# Altium PCB DC-LAB-UPS-230V.PcbDoc (part 1 of 2)
Units mm, origin at the board's own origin, x right, y up, seen from the top; angles counter-clockwise.
Board outline 144.53 x 143.51 mm, 2 copper layers (Top Layer, Bottom Layer), stack 1.6 mm thick; 79 components, 50 nets, 289 pads, 57 vias.
Unrouted connection lines stored in the file: 4.
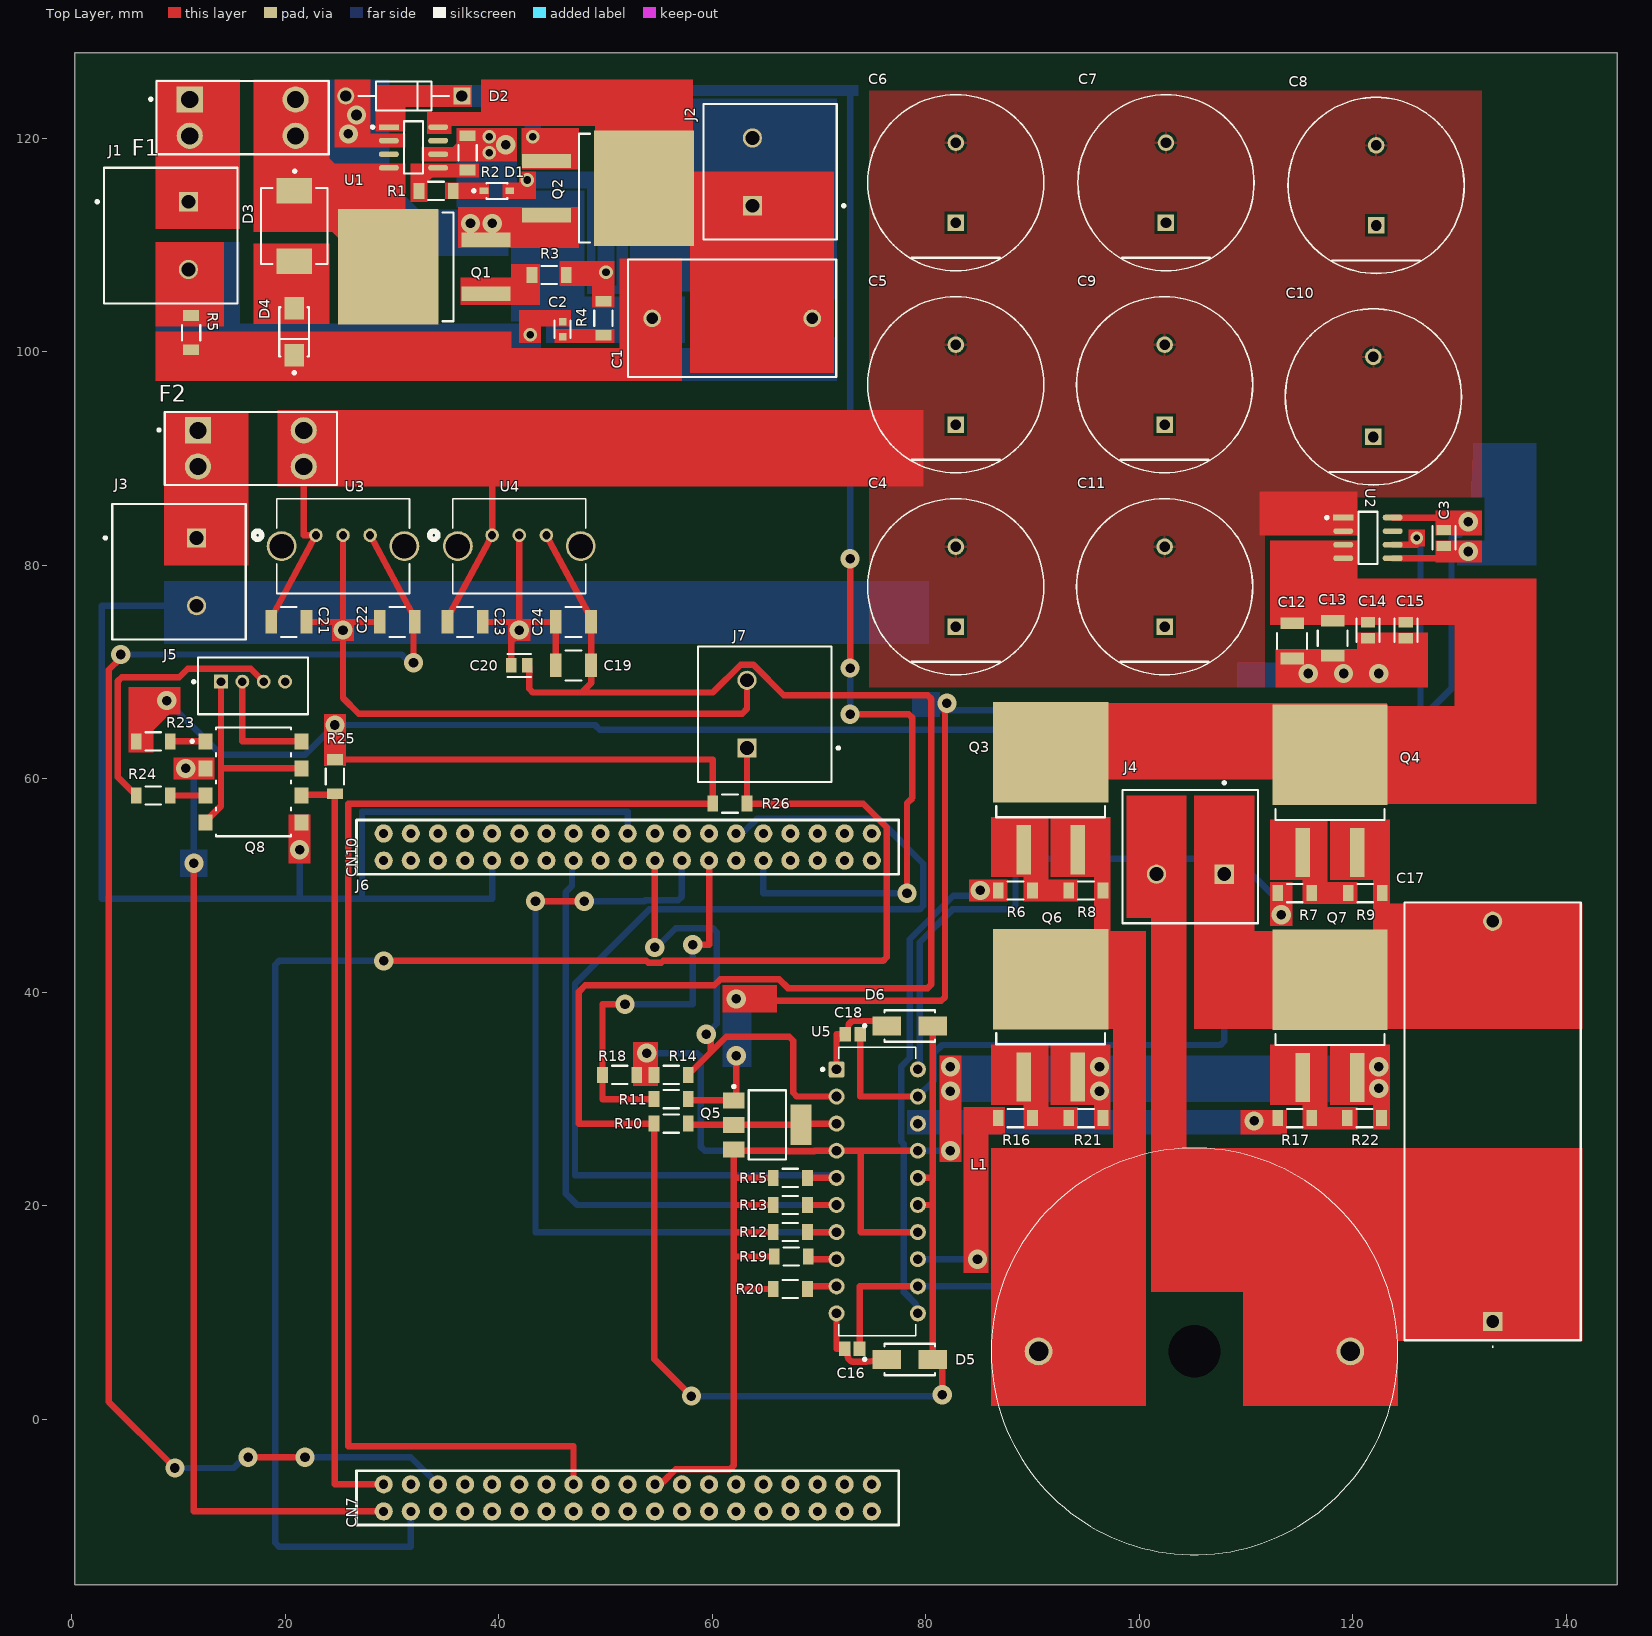
[diagram p0: Top Layer view]
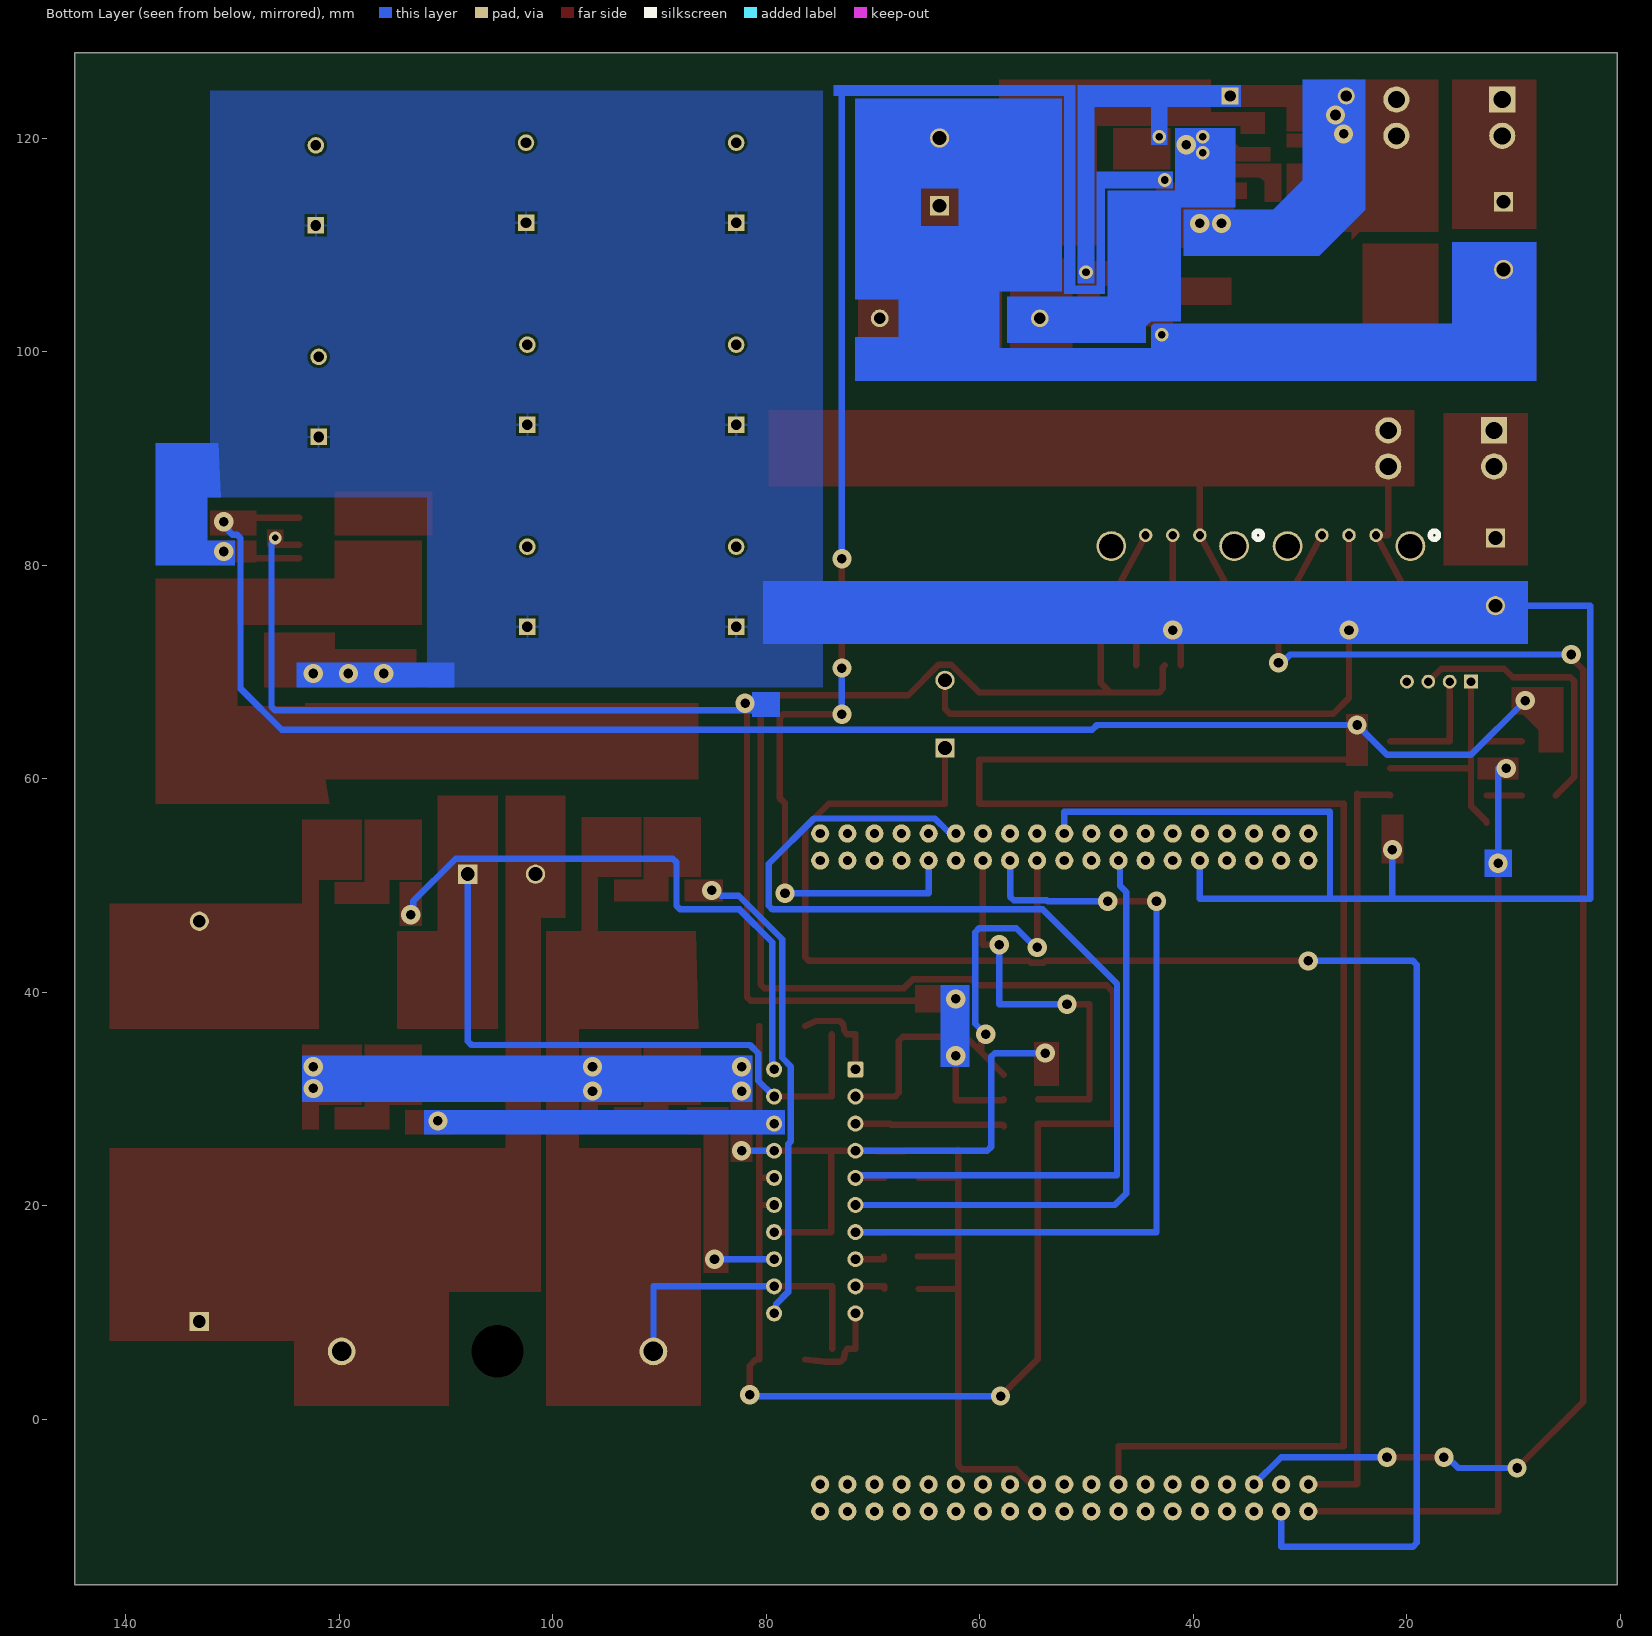
[diagram p1: Bottom Layer view, seen from below]

## Layer stack, top to bottom
Top Solder: solder mask 0.0102, Solder Resist, Dk 3.5
Top Layer: signal copper 0.07
Dielectric 1: dielectric 1.4605, FR-4, Dk 4.6
Bottom Layer: signal copper 0.07
Bottom Solder: solder mask 0.0102, Solder Resist, Dk 3.5

## Board outline
0.254,-15.494 144.78,-15.494 144.78,128.016 0.254,128.016

## Design rules (kind name [scope] priority, off if disabled: settings)
AssemblyTestPointUsage [All] p1: isadvanced=TRUE
AssemblyTestpoint [All] p1: isadvanced=TRUE testpointundercomponent=TRUE minsize=1.016 maxsize=2.54 preferedsize=1.524 minholesize=0 maxholesize=1.016 preferedholesize=0.813 testpointgrid=0.025 usegrid=TRUE gridtolerance=0 allowsidetop=TRUE allowsidebottom=TRUE
Clearance Clearance_1 [OnMid vs OnMid] p1: gap=0.254 ignorepadtopadclearanceinfootprint=FALSE sourcerule=42 cellrowname=All cellrowtype=0 cellcolname=All cellcoltype=0 innerlayers=TRUE
Clearance Clearance_2 [(ExistsOnLayer('Top Layer') Or ExistsOnLayer('Bottom Layer')) vs (ExistsOnLayer('Top Layer') Or ExistsOnLayer('Bottom Layer'))] p2: gap=0.254 ignorepadtopadclearanceinfootprint=FALSE sourcerule=42 cellrowname=All cellrowtype=0 cellcolname=All cellcoltype=0 outerlayers=TRUE
Clearance [All] p3: gap=0.254 ignorepadtopadclearanceinfootprint=FALSE ismatrix=TRUE
ComponentClearance [All] p1: isadvanced=TRUE gap=0.254 collisioncheckmode=3 verticalgap=0.254 showdistances=FALSE
FabricationTestPointUsage [All] p1: isadvanced=TRUE valid=0 allowmultiple=FALSE
FabricationTestpoint [All] p1: isadvanced=TRUE side=3 testpointundercomponent=TRUE minsize=1.016 maxsize=2.54 preferedsize=1.524 minholesize=0 maxholesize=1.016 preferedholesize=0.813 testpointgrid=0.025 allowsidetop=TRUE allowsidebottom=TRUE usegrid=TRUE gridtolerance=0
FanoutControl Fanout_BGA [IsBGA] p1: isadvanced=TRUE bgadir=Out bgaviamode=Centered fanoutstyle=Auto fanoutdirection=Alternating viagrid=0.025 // Fanout_BGA (Default Rule)
FanoutControl Fanout_LCC [IsLCC] p2: isadvanced=TRUE bgadir=Out bgaviamode=Centered fanoutstyle=Auto fanoutdirection=Alternating viagrid=0.025 // Fanout_LCC (Default Rule)
FanoutControl Fanout_SOIC [IsSOIC] p3: isadvanced=TRUE bgadir=Out bgaviamode=Centered fanoutstyle=Auto fanoutdirection=Alternating viagrid=0.025 // Fanout_SOIC (Default Rule)
FanoutControl Fanout_Small [(CompPinCount < 5)] p4: isadvanced=TRUE bgadir=Out bgaviamode=Centered fanoutstyle=Auto fanoutdirection=OutThenIn viagrid=0.025 // Fanout_Small (Default Rule)
FanoutControl Fanout_Default [All] p5: isadvanced=TRUE bgadir=Out bgaviamode=Centered fanoutstyle=Auto fanoutdirection=Alternating viagrid=0.025 // Fanout_Default (Default Rule)
Height [All] p1: isadvanced=TRUE minheight=0 maxheight=40.4 prefheight=12.7
HoleSize [All] p1: isadvanced=TRUE absolutevalues=TRUE maxlimit=2.54 minlimit=0.025 maxpercent=80.000 minpercent=20.000
HoleToHoleClearance [All] p1: isadvanced=TRUE gap=0.254 allowstackedmicrovias=TRUE
LayerPairs [All] p1: isadvanced=TRUE enforce=TRUE
MinimumSolderMaskSliver [All] p1: isadvanced=TRUE minsoldermaskwidth=0.254
NetAntennae [All] p1: isadvanced=TRUE netantennaetolerance=0
PasteMaskExpansion [All] p1: isadvanced=TRUE expansion=0
PlaneClearance [All] p1: isadvanced=TRUE clearance=0.508
PlaneConnect [All] p1: isadvanced=TRUE planeconnectstyle=Relief reliefexpansion=0.508 reliefentries=4 reliefconductorwidth=0.254 reliefairgap=0.254
PolygonConnect [All] p1: connectstyle=Relief reliefconductorwidth=0.254 reliefentries=4 polygonreliefangle="90 Angle" airgapwidth=0.254
RoutingCorners [All] p1: isadvanced=TRUE cornerstyle=45-Degree minsetback=2.54 maxsetback=2.54
RoutingPriority [All] p1: isadvanced=TRUE routingpriority=0
RoutingVias RoutingViaStyle_1 [All] p1: isadvanced=TRUE holewidth=0.254 width=0.254 viastyle="Through Hole" minholewidth=0.254 minwidth=0.254 maxholewidth=1.2 maxwidth=1.8
RoutingVias [All] p2: holewidth=0.711 width=1.27 viastyle="Through Hole" minholewidth=0.711 minwidth=1.27 maxholewidth=0.711 maxwidth=1.27
ShortCircuit [All] p1: isadvanced=TRUE allowed=FALSE
SilkToSilkClearance [All] p1: isadvanced=TRUE silktosilkclearance=0.254
SilkToSolderMaskClearance [IsPad] p1: isadvanced=TRUE minsilkscreentomaskgap=0.254 clearancetoexposedcopper=TRUE
SolderMaskExpansion [All] p1: isadvanced=TRUE expansion=0 istentingtop=FALSE
SupplyNets "Schematic Supply Nets_2" [InNet('BAT_OUT-')] p1: isadvanced=TRUE voltage=0.000
SupplyNets "Schematic Supply Nets_5" [InNet('BAT_OUT+')] p2: isadvanced=TRUE voltage=0.000
SupplyNets "Schematic Supply Nets_4" [InNet('BAT_IN+')] p3: isadvanced=TRUE voltage=0.000
SupplyNets "Schematic Supply Nets_1" [InNet('VIN-')] p4: isadvanced=TRUE voltage=0.000
SupplyNets "Schematic Supply Nets" [InNet('VIN+')] p5: isadvanced=TRUE voltage=0.000
UnRoutedNet [All] p1: isadvanced=TRUE
UnpouredPolygon [All] p1: isadvanced=TRUE
Width [All] p1: maxlimit=8 minlimit=0.254 preferedwidth=0.6 minimp=50.000000 maximp=50.000000 favimp=50.000000
4 further rules are at their usual default settings.

## Classes and differential pairs
component class Control_Stage: J5 J6 J7 Q8 R23 R24 R25 R26
component class Output_Stage: C3 C4 C5 C6 C7 C8 C9 C10 C11 C12 C13 C14 C15 C16 C17 C18 C19 C20 C21 C22 C23 C24 D5 D6 F2 J3 J4 L1 Q3 Q4 Q5 Q6 Q7 R6 R7 R8 R9 R10 R11 R12 R13 R14 R15 R16 R17 R18 R19 R20 R21 R22 U2 U3 U4 U5
component class Input_Stage: C1 C2 D1 D2 D3 D4 F1 J1 J2 Q1 Q2 R1 R2 R3 R4 R5 U1

## Components (designator, comment, footprint, x,y, rotation, side; value= is the part's Value field where it differs from the comment)
C1 "2.2uF 5%" WCAP-FTBP_L18W10H16.5 61.856,103.124 r180 top
C2 "10nF 10%" FP-C1608-080-0_1-MFG 45.974,102.108 r90 top
C3 "100nF 10%" FP-C0805C-DN-MFG 128.524,82.55 r270 top value="0.10 μF"
C4 "680uF 20%" FP-RAD-TH-D_16_0_5-L_25_2-MFG 82.804,77.978 r90 top
C5 "680uF 20%" FP-RAD-TH-D_16_0_5-L_25_2-MFG 82.804,96.901 r90 top
C6 "680uF 20%" FP-RAD-TH-D_16_0_5-L_25_2-MFG 82.804,115.824 r90 top
C7 "680uF 20%" FP-RAD-TH-D_16_0_5-L_25_2-MFG 102.489,115.824 r90 top
C8 "680uF 20%" FP-RAD-TH-D_16_0_5-L_25_2-MFG 122.174,115.57 r90 top
C9 "680uF 20%" FP-RAD-TH-D_16_0_5-L_25_2-MFG 102.362,96.901 r90 top
C10 "680uF 20%" FP-RAD-TH-D_16_0_5-L_25_2-MFG 121.92,95.758 r90 top
C11 "680uF 20%" FP-RAD-TH-D_16_0_5-L_25_2-MFG 102.362,77.978 r90 top
C12 "4.7uF 10%" FP-CNA6P-MFG 114.3,72.898 r270 top value=4.7uF
C13 "4.7uF 10%" FP-CNA6P-MFG 118.11,73.152 r270 top value=4.7uF
C14 "100nF 10%" FP-C0805C-DN-MFG 121.412,73.902 r90 top value="0.10 μF"
C15 "100nF 10%" FP-C0805C-DN-MFG 124.968,73.902 r90 top value="0.10 μF"
C16 "1uF 25V" CAPC2013X140X50LL20T25 73.09,6.604 r0 top
C17 "PHE426HR8100JR06L2" PHE426HR8100JR06L2 133.096,9.144 r90 top
C18 "1uF 25V" CAPC2013X140X50LL20T25 73.152,36.068 r0 top
C19 "4.7uF 10%" FP-CNA6P-MFG 46.99,70.612 r180 top value=4.7uF
C20 "100nF 10%" FP-C0805C-DN-MFG 41.91,70.612 r0 top value="0.10 μF"
C21 "4.7uF 10%" FP-CNA6P-MFG 20.32,74.676 r180 top value=4.7uF
C22 "10uF 10%" FP-C3225-250-0_4-MFG 30.48,74.676 r0 top
C23 "4.7uF 10%" FP-CNA6P-MFG 36.83,74.676 r180 top value=4.7uF
C24 "10uF 10%" FP-C3225-250-0_4-MFG 46.99,74.676 r0 top
D1 "BAV21WS-E3-08" FP-S8-V-3910_02-001-MFG 39.808,115.062 r0 top
D2 "Zener 12V" FP-017AH-MFG 31.092,123.952 r180 top
D3 "TVS 33V" FP-SMCJ-MFG 20.828,111.76 r270 top
D4 "TVS 24V" FP-SMAJ-MFG 20.828,101.854 r90 top
D5 "ES1D" FP-403AE-MFG 78.486,5.588 r0 top value=7pF
D6 "ES1D" FP-403AE-MFG 78.486,36.83 r0 top value=7pF
F1 "Fuse Holder 30A" FP-3568-MFG 16.002,121.92 r0 top
F2 "Fuse Holder 30A" FP-3568-MFG 16.764,90.932 r0 top
J1 "10-24 AWG" PHOE-1714955_V 10.922,110.871 r270 top
J2 "10-24 AWG" PHOE-1714955_V 63.754,116.84 r90 top
J3 "10-24 AWG" PHOE-1714955_V 11.684,79.375 r270 top
J4 "10-24 AWG" PHOE-1714955_V 104.775,51.054 r180 top
J5 "110990030" FP-110990030-MFG 16.97,68.688 r0 top
J6 "NUCLEO_L476RGT6_Headers" NUCLEO_L4764RGT6_Header 52.07,23.114 r90 top
J7 "10-24 AWG" PHOE-1714955_V 63.246,66.04 r90 top
L1 "1140-101K-RC" 1140101KRC 90.551,6.35 r0 top
Q1 "N-MOSFET 80V" FP-PG-TO263-3-MFG 33.02,107.95 r90 top
Q2 "N-MOSFET 80V" FP-PG-TO263-3-MFG 50.225,115.316 r270 top
Q3 "AHO" FP-PG-TO263-3-MFG 91.694,59.115 r0 top
Q4 "BHO" FP-PG-TO263-3-MFG 117.856,58.855 r0 top
Q5 "PZT3904T1G" ONSC-SOT-223-4-318E-04_V 65.154,27.562 r0 top
Q6 "ALO" FP-PG-TO263-3-MFG 91.694,37.846 r0 top
Q7 "BLO" FP-PG-TO263-3-MFG 117.856,37.779 r0 top
Q8 "LTV-827S-TA1" FP-LTV-827S-TA1-MFG 17.018,59.69 r0 top
R1 "1.02kR 1% 0.25W" FP-RT1206-MFG 34.112,115.062 r180 top value=1.02KΩ
R2 "47kR 1% 0.25W" FP-RT1206-MFG 37.084,118.618 r90 top value=47KΩ
R3 "10R 1% 0.25W" FP-RT1206-MFG 44.704,107.188 r180 top value=10Ω
R4 "10kR 1% 0.25W" FP-RT1206-MFG 49.784,103.124 r270 top value=10KΩ
R5 "1.02kR 1% 0.25W" FP-RT1206-MFG 11.176,101.778 r90 top value=1.02KΩ
R6 "10R 1% 0.25W" FP-RT1206-MFG 88.392,49.53 r180 top value=10Ω
R7 "10R 1% 0.25W" FP-RT1206-MFG 114.554,49.276 r180 top value=10Ω
R8 "10kR 1%" FP-RT1206-MFG 94.996,49.53 r0 top value=10KΩ
R9 "10kR 1%" FP-RT1206-MFG 121.158,49.276 r0 top value=10KΩ
R10 "10kR 1% 0.25W" FP-RT1206-MFG 56.134,27.686 r0 top value=10KΩ
R11 "4.7kR 1% 0.25W" FP-RT1206-MFG 56.134,29.972 r0 top value=4.7KΩ
R12 "4.7kR 1% 0.25W" FP-RT1206-MFG 67.31,17.526 r0 top value=4.7KΩ
R13 "4.7kR 1% 0.25W" FP-RT1206-MFG 67.31,20.066 r0 top value=4.7KΩ
R14 "4.7kR 1% 0.25W" FP-RT1206-MFG 56.134,32.258 r0 top value=4.7KΩ
R15 "4.7kR 1% 0.25W" FP-RT1206-MFG 67.31,22.606 r0 top value=4.7KΩ
R16 "10R 1% 0.25W" FP-RT1206-MFG 88.392,28.194 r180 top value=10Ω
R17 "10R 1% 0.25W" FP-RT1206-MFG 114.554,28.194 r180 top value=10Ω
R18 "100k 0.1%" FP-RT1206-MFG 51.308,32.258 r0 top value=100KΩ
R19 "100k 0.1%" FP-RT1206-MFG 67.386,15.24 r180 top value=100KΩ
R20 "100k 0.1%" FP-RT1206-MFG 67.31,12.192 r180 top value=100KΩ
R21 "10kR 1%" FP-RT1206-MFG 94.996,28.194 r0 top value=10KΩ
R22 "10kR 1%" FP-RT1206-MFG 121.082,28.194 r0 top value=10KΩ
R23 "680R 1% 0.25W" FP-RT1206-MFG 7.62,63.5 r0 top value=680Ω
R24 "680R 1% 0.25W" FP-RT1206-MFG 7.62,58.42 r0 top value=680Ω
R25 "3.3kR 1% 0.25W" FP-RT1206-MFG 24.638,60.198 r270 top value=3.3KΩ
R26 "10kR 1% 0.25W" FP-RT1206-MFG 61.646,57.658 r0 top value=10KΩ
U1 "IDEAL DIODE CONTROLLER" FP-S8-8-05-08-1610-IPC_C 32.004,119.126 r0 top
U2 "ACS711ELCTR-12AB-T" FP-LC-8-IPC_C 121.412,82.55 r0 top
U3 "TSR 1-4850WI" TSR1WI-SINGLE_TRP 22.86,82.804 r0 top
U4 "TSR 1-48120WI" TSR1WI-SINGLE_TRP 39.37,82.804 r0 top
U5 "HIP4081AIPZ" DIP762W46P254L2590H533Q20_E20_3_N 75.438,21.336 r0 top

## Footprints (in the part's own frame and the unit in brackets; to place one, negate y for a bottom-side part, rotate by r counter-clockwise, add the part's x,y. Pads: shape width x height; smd on the part's side, far side on the other; paste and mask are expansions set on the pad)
1140101KRC [mm]
  round 2.6 hole 1.826: 1(0,0) 2(29.21,0)
  round 2.451 hole 4.902 unplated: 3(14.605,0)
  silkscreen extent -4.44,-19.05 33.66,19.05, body extent -4.45,-19.05 33.65,19.05, height 26.35
CAPC2013X140X50LL20T25 [mm] "Chip Capacitor, 2-Leads, Body 2.00x1.25mm, IPC High Density"
  rect 1.1x1.35 smd: 1(-0.7,0) 2(0.7,0)
  body extent -1.1,-0.72 1.1,0.72, height 1.4
DIP762W46P254L2590H533Q20_E20_3_N [mm] "DIP, Lead Span 7.62mm, Lead Width 0.46mm, Pitch 2.54mm, Body Length 25.90mm, Height 5.33mm, IPC Medium Density"
  rrect25% 1.5x1.5 hole 0.9: 1(-3.81,11.43)
  round 1.5 hole 0.9: 2(-3.81,8.89) 3(-3.81,6.35) 4(-3.81,3.81) 5(-3.81,1.27) 6(-3.81,-1.27) 7(-3.81,-3.81) 8(-3.81,-6.35) 9(-3.81,-8.89) 10(-3.81,-11.43) 11(3.81,-11.43) 12(3.81,-8.89) 13(3.81,-6.35) 14(3.81,-3.81) 15(3.81,-1.27) 16(3.81,1.27) 17(3.81,3.81) 18(3.81,6.35) 19(3.81,8.89) 20(3.81,11.43)
  silkscreen extent -5.23,-13.51 3.62,13.51, body extent -3.95,-12.95 3.95,12.95, height 5.33
FP-017AH-MFG [mm]
  rect 1.6x1.6 hole 1.05 paste-2539.97 mask+0: 1(-5.438,0)
  round 1.6 hole 1.05 paste-2539.97 mask+0: 2(5.438,0)
  silkscreen extent -4.24,-1.36 4.24,1.36, body extent -6.34,-1.46 6.34,1.46, height 0.25
FP-403AE-MFG [mm]
  rect 2.65x1.75 smd paste+0 mask+0: 1(-2.15,0) 2(2.15,0)
  silkscreen extent -4.35,-1.48 2.37,1.48, body extent -3.57,-1.58 3.57,1.58, height 0.25
FP-3568-MFG [mm]
  round 2.45 hole 1.6 paste-2539.97 mask+0: 1(-4.96,-1.7) 2(4.96,-1.7) 2(4.96,1.7)
  rect 2.45x2.45 hole 1.6 paste-2539.97 mask+0: 1(-4.96,1.7)
  silkscreen extent -8.72,-3.43 8.07,3.43, body extent -8.17,-3.53 8.17,3.53, height 0.25
FP-110990030-MFG [mm]
  rect 1.3x1.3 hole 0.8 paste-2539.97 mask+0: 1(-3,0.4)
  round 1.3 hole 0.8 paste-2539.97 mask+0: 2(-1,0.4) 3(1,0.4) 4(3,0.4)
  silkscreen extent -5.67,-2.65 5.15,2.65, body extent -5.25,-2.75 5.25,2.75, height 0.25
FP-C0805C-DN-MFG [mm]
  rect 0.95x1.35 smd paste+0 mask+0: 1(-0.75,0) 2(0.75,0)
  silkscreen extent -1.1,-1.07 1.1,1.07, body extent -1.4,-0.85 1.4,0.85, height 0.25
FP-C1608-080-0_1-MFG [mm]
  rect 0.7x0.7 smd paste+0 mask+0: 1(-0.7,0) 2(0.7,0)
  silkscreen extent -0.8,-0.75 0.8,0.75, body extent -1.15,-0.55 1.15,0.55, height 0.25
FP-C3225-250-0_4-MFG [mm]
  rect 1.1x2.2 smd paste+0 mask+0: 1(-1.65,0) 2(1.65,0)
  silkscreen extent -0.72,-1.4 0.72,1.4, body extent -2.3,-1.5 2.3,1.5, height 0.25
FP-CNA6P-MFG [mm]
  rect 1.1x2.2 smd paste+0 mask+0: 1(-1.65,0) 2(1.65,0)
  silkscreen extent -0.72,-1.4 0.72,1.4, body extent -2.3,-1.5 2.3,1.5, height 0.25
FP-LC-8-IPC_C [mm]
  rect 1.874x0.542 smd paste+0 mask+0: 1(-2.316,1.905)
  rrect100% 1.874x0.542 smd paste+0 mask+0: 2(-2.316,0.635) 3(-2.316,-0.635) 4(-2.316,-1.905) 5(2.316,-1.905) 6(2.316,-0.635) 7(2.316,0.635) 8(2.316,1.905)
  silkscreen extent -3.97,-2.45 0.88,2.45, body extent -3.35,-2.55 3.35,2.55, height 0.25
FP-LTV-827S-TA1-MFG [mm]
  rect 1.3x1.5 smd paste+0 mask+0: 1(-4.5,3.81) 2(-4.5,1.27) 3(-4.5,-1.27) 4(-4.5,-3.81) 5(4.5,-3.81) 6(4.5,-1.27) 7(4.5,1.27) 8(4.5,3.81)
  silkscreen extent -5.87,-5.09 3.5,5.09, body extent -5.25,-5.19 5.25,5.19, height 0.25
FP-PG-TO263-3-MFG [mm]
  rect 1.35x4.6 smd paste-1000 mask+0: 1(-2.54,-5.775) 3(2.54,-5.775)
  rect 10.8x9.4 smd paste-1000 mask+0: 4(0,3.375)
  silkscreen extent -5.1,-2.73 5.1,-1.7, body extent -5.5,-8.18 5.5,8.18, height 0.25
FP-RAD-TH-D_16_0_5-L_25_2-MFG [mm]
  rect 1.55x1.55 hole 1 paste-2539.97 mask+0: 1(-3.75,0)
  round 1.55 hole 1 paste-2539.97 mask+0: 2(3.75,0)
  silkscreen extent -8.25,-8.25 8.25,8.25, body extent -8.35,-8.35 8.35,8.35, height 0.25
FP-RT1206-MFG [mm]
  rect 1x1.5 smd paste+0 mask+0: 1(-1.6,0) 2(1.6,0)
  silkscreen extent -0.72,-0.85 0.72,0.85, body extent -2.2,-0.95 2.2,0.95, height 0.25
FP-S8-8-05-08-1610-IPC_C [mm]
  rect 1.877x0.521 smd paste+0 mask+0: 1(-2.313,1.905)
  rrect100% 1.877x0.521 smd paste+0 mask+0: 2(-2.313,0.635) 3(-2.313,-0.635) 4(-2.313,-1.905) 5(2.313,-1.905) 6(2.313,-0.635) 7(2.313,0.635) 8(2.313,1.905)
  silkscreen extent -3.95,-2.45 0.87,2.45, body extent -3.35,-2.55 3.35,2.55, height 0.25
FP-S8-V-3910_02-001-MFG [mm]
  rect 0.8x0.6 smd paste+0 mask+0: 1(-1.2,0) 2(1.2,0)
  silkscreen extent -2.27,-0.75 0.97,0.75, body extent -1.7,-0.85 1.7,0.85, height 0.25
FP-SMAJ-MFG [mm]
  rect 2.1x1.8 smd paste+0 mask+0: 1(-2.2,0) 2(2.2,0)
  silkscreen extent -3.95,-1.4 2.3,1.4, body extent -3.35,-1.5 3.35,1.5, height 0.25
FP-SMCJ-MFG [mm]
  rect 2.4x3.3 smd paste+0 mask+0: 1(-3.3,0) 2(3.3,0)
  silkscreen extent -5.27,-3.11 3.55,3.11, body extent -4.6,-3.21 4.6,3.21, height 0.25
NUCLEO_L4764RGT6_Header [mm]
  round 1.7 hole 0.85: 1(-31.75,22.86) 2(-29.21,22.86) 3(-31.75,20.32) 4(-29.21,20.32) 5(-31.75,17.78) 6(-29.21,17.78) 7(-31.75,15.24) 8(-29.21,15.24) 9(-31.75,12.7) 10(-29.21,12.7) 11(-31.75,10.16) 12(-29.21,10.16) 13(-31.75,7.62) 14(-29.21,7.62) 15(-31.75,5.08) 16(-29.21,5.08) 17(-31.75,2.54) 18(-29.21,2.54) 19(-31.75,0) 20(-29.21,0) 21(-31.75,-2.54) 22(-29.21,-2.54) 23(-31.75,-5.08) 24(-29.21,-5.08) 25(-31.75,-7.62) 26(-29.21,-7.62) 27(-31.75,-10.16) 28(-29.21,-10.16) 29(-31.75,-12.7) 30(-29.21,-12.7) 31(-31.75,-15.24) 32(-29.21,-15.24) 33(-31.75,-17.78) 34(-29.21,-17.78) 35(-31.75,-20.32) 36(-29.21,-20.32) 37(-31.75,-22.86) 38(-29.21,-22.86) 39(29.21,22.86) 40(31.75,22.86) 41(29.21,20.32) 42(31.75,20.32) 43(29.21,17.78) 44(31.75,17.78) 45(29.21,15.24) 46(31.75,15.24) 47(29.21,12.7) 48(31.75,12.7) 49(29.21,10.16) 50(31.75,10.16) 51(29.21,7.62) 52(31.75,7.62) 53(29.21,5.08) 54(31.75,5.08) 55(29.21,2.54) 56(31.75,2.54) 57(29.21,0) 58(31.75,0) 59(29.21,-2.54) 60(31.75,-2.54) 61(29.21,-5.08) 62(31.75,-5.08) 63(29.21,-7.62) 64(31.75,-7.62) 65(29.21,-10.16) 66(31.75,-10.16) 67(29.21,-12.7) 68(31.75,-12.7) 69(29.21,-15.24) 70(31.75,-15.24) 71(29.21,-17.78) 72(31.75,-17.78) 73(29.21,-20.32) 74(31.75,-20.32) 75(29.21,-22.86) 76(31.75,-22.86)
  silkscreen extent -33.02,-25.4 33.02,25.4, body extent -33.02,-24.09 33.02,24.09, height 7.2
ONSC-SOT-223-4-318E-04_V [mm] "SOT223, 4-Leads, Body 6.5x3.5mm, Pitch 2.3mm"
  rect 2x1.5 smd: 1(-3.15,2.3) 2(-3.15,0) 3(-3.15,-2.3)
  rect 2x3.8 smd: 4(3.15,0)
  silkscreen extent -3.27,-3.25 1.75,3.72, body extent -1.75,-3.25 1.75,3.25, height 1.75
PHE426HR8100JR06L2 [mm]
  rect 1.8x1.8 hole 1.2: 1(0,0)
  round 1.8 hole 1.2: 2(37.5,0)
  silkscreen extent -2.4,-8.25 39.25,8.25, body extent -1.75,-8.25 39.25,8.25, height 32.1
PHOE-1714955_V [mm] "Terminal Block, 2-Leads, Body 12.7x12.5mm, Pitch 6.35mm"
  rect 1.8x1.8 hole 1.3: 1(-3.175,0)
  round 1.8 hole 1.3: 2(3.175,0)
  silkscreen extent -6.35,-8.67 6.35,4.6, body extent -6.92,-7.9 6.35,4.6, height 21.51
TSR1WI-SINGLE_TRP [mil]
  round 50 / inner round 60 / far side round 50 hole 30 paste-99999 mask+0: 1(0,0) 2(100,0) 3(200,0)
  round 110 / inner round 60 / far side round 110 hole 90 paste-99999 mask-55: 4(-126.5,-40) 5(326.5,-40)
  silkscreen extent -230,-215 345,135
WCAP-FTBP_L18W10H16.5 [mm] "Film Capacitors, 18.00 x 10.00 mm"
  round 1.65 hole 1.1: 1(-7.5,0) 2(7.5,0)
  silkscreen extent -9.75,-5.5 9.75,5.5, body extent -9,-5 9,5, height 16.55

## Part data
C1: library part CMP-03913-89437347-3, "890443325010CS / Cap, 2.2Uf, 160V, Film, Radial Rohs Compliant: Yes", Capacitance=2.2µF, ESR (Equivalent Series Resistance)=10.5mΩ, Insulation Resistance=4.55GΩ, Max Operating Temperature=105°C, Min Operating Temperature=-40°C, Voltage Rating=160V, Height=16.5mm, Length=18mm, Packaging=Carton, Pin Length=4mm, Pitch=15mm, RoHS=Compliant, Width=10mm
C2: library part CMP-08246-003501-1, "C1608X7R2A103K080AA / Multilayer Ceramic Capacitors 10nF ±10% 100V X7R SMD 0603", Capacitance=10nF, Case Code (Imperial)=0603, Case Code (Metric)=1608, Dielectric=X7R, Max Operating Temperature=125°C, Min Operating Temperature=-55°C, Package Quantity=1, Resistor Type=Ceramic, Tolerance=10%, Voltage=100V, Case/Package=0603, Construction=Flat, Depth=0.8mm, Height=0.8mm, Lead Free="Lead Free", Length=1.6mm, Mount="Surface Mount", Number of Pins=2, Packaging="Tape and Reel", Radiation Hardening=No, REACH SVHC="No SVHC", RoHS Compliant=Yes, Series=C, Termination=SMD/SMT, Thickness=0.037inch, Voltage Rating=100V, Voltage Rating (DC)=100V, Weight=7.1E-05oz, Width=0.8mm
C3 C14 C15 C20: library part CMP-2007-00279-2, "C0805C104K5RACTU / CAP CER 0.1UF 50V X7R 0805", Capacitance="0.10 μF", Manufacturer=KEMET, Manufacturer Part Number=C0805C104K5RACTU, Package=C0805C-DN, Temperature="-55°C to +125°C", Temperature Characteristic=X7R, Temperature Coefficient=30ppm/°C, Temperature Range High=+125°C, Temperature Range Low=-55°C, Tolerance=0.1, Voltage Rating="50 V", Automotive=No, Category=Cap, ComponentLink2Description=Datasheet, ComponentLink2URL=https://content.kemet.com/datasheets/KEM_C1003_C0G_SMD.pdf, Device Class L1="Passive Components", Device Class L2=Capacitors, Device Class L3="Ceramic Capacitors", Digikey Description="CAP CER 0.1UF 50V X7R 0805", Height=0.88mm, Ipc Land Pattern Name=CAPC200125X78, Lead Free=Yes, Material=Ceramic, Mouser Description="Cap Ceramic 0.1uF 50V X7R 10% SMD 2.0 x 1.2 mm 125 C Paper T/R", Octopart=https://octopart.com/c0805c104k5ractu-kemet-143926, RoHS=TRUE
C4 C5 C6 C7 C8 C9 C10 C11: library part CMP-05427-001257-1, "EEUFS1K681B / Aluminum Electrolytic Capacitors (Radial Lead Type) 680uF ±20% 80V", RoHS Compliant=Yes
C12 C13 C19 C21 C23: library part CMP-08246-000008-1, "CNA6P1X7R2A475K250AE / CAP CER 4.7UF 100V X7R 1210", Capacitance=4.7uF, Manufacturer=TDK, Manufacturer Part Number=CNA6P1X7R2A475K250AE, Package=CNA6P, Temperature="-55°C to +125°C", Temperature Characteristic=X7R, Temperature Coefficient=15%, Temperature Range High=+125°C, Temperature Range Low=-55°C, Tolerance=10%, Voltage Rating=100V, Automotive=Yes, Automotive Grade="Grade 1", Category=Cap, ComponentLink2Description=Datasheet, ComponentLink2URL=https://product.tdk.com/info/en/catalog/datasheets/mlcc_automotive_soft_cna_en.pdf, Device Class L1="Passive Components", Device Class L2=Capacitors, Device Class L3="Ceramic Capacitors", Digikey Description="CAP CER 4.7UF 100V X7R 1210", Footprint Url=https://product.tdk.com/info/en/catalog/spec/mlccspec_automotive_soft_cna_en.pdf, Height=2.8mm, Ipc Land Pattern Name=CAPC320250X250, Lead Free=Yes, Material=Ceramic, Octopart=https://octopart.com/cna6p1x7r2a475k250ae-tdk-96979044, RoHS=TRUE
C16 C18: library part CMP-2007-03234-1, "C0805C105K3RACTU", Manufacturer=Kemet, Part Number=C0805C105K3RACTU
C17: "Capacitor", Manufacturer_Name="Yageo Group", Mouser Part Number=80-PHE426HR8100JR6L2, Datasheet Link=https://search.kemet.com/component-documentation/download/specsheet/F426RK106J250C, Height=32mm, Manufacturer_Part_Number=PHE426HR8100JR06L2, Mouser Price/Stock=https://www.mouser.co.uk/ProductDetail/KEMET/PHE426HR8100JR06L2?qs=LpuuGx8iR2QFB19k2AHYGw%3D%3D
C22 C24: library part CMP-08246-003742-1, "C3225X7R1N106K250AC / Multilayer Ceramic Capacitors 10uF ±10% 75V X7R SMD 1210", RoHS Compliant=Yes
D1: library part CMP-02540-000084-1, "DIODE GEN PURP 200V 250MA SOD323", Average Rectified Current=250mA, Case/Package=SOD-323-2, Diode Capacitance-Max=1.5pF, Forward Current=200mA, Forward Voltage=1.25V, Max Forward Surge Current (Ifsm)=1A, Max Operating Temperature=150°C, Max Power Dissipation=200mW, Max Repetitive Reverse Voltage (Vrrm)=250V, Max Reverse Current=15uA, Max Reverse Leakage Current=100nA, Max Reverse Voltage (DC)=200V, Max Surge Current=625mA, Min Operating Temperature=-55°C, Package Quantity=15000, Contact Plating=Tin, Element Configuration=Single, Lead Free="Lead Free", Mount="Surface Mount", Number of Pins=2, Packaging="Tape and Reel", Peak Non-Repetitive Surge Current=1A, Power Dissipation=200mW, Reverse Recovery Time=50ns, Reverse Recovery Time-Max=50ns, RoHS Compliant=Yes, Series="Automotive, AEC-Q101", Weight=0.000152oz
D2: library part CMP-07164-000008-1, "BZX85C12 / DIODE ZENER 12V 1W DO41", Forward Current=200mA, Manufacturer="ON Semiconductor", Manufacturer Part Number=BZX85C12, Max Junction Temp=+200°C, Max Reverse Leakage Current=0.5uA, Max Zener Voltage=12.7V, Nom Zener Voltage=12V, Package=017AH, Power Dissipation=1W, Reverse Voltage=8.4V, Temperature="-65°C to +200°C", Temperature Range Low=-65°C, Automotive=No, Category=Diode, ComponentLink2Description=Datasheet, ComponentLink2URL=https://www.onsemi.com/pub/Collateral/BZX85C3V3-D.PDF, Device Class L1="Discrete Semiconductors", Device Class L2=Diodes, Device Class L3="Zener Diodes", Digikey Description="DIODE ZENER 12V 1W DO41", Footprint Url=https://www.onsemi.com/pub/Collateral/017AH.PDF, Height=2.72mm, Ipc Land Pattern Name=DIOPA1088W105L520D272, Lead Free=Yes, Mouser Description="Zener Diodes 12V 1W Zener", Octopart=https://octopart.com/bzx85c12-on+semiconductor-84409056, RoHS=TRUE, Temperature Range High=+200°C, Zener Impedance=9Ω
D3: library part CMP-2000-07107-2, "SMCJ33A / TVS DIODE 33V 53.3V DO214AB", Breakdown Voltage=36.7V, Clamping Voltage=53.3V, Manufacturer="Littelfuse Inc", Manufacturer Part Number=SMCJ33A, Max Junction Temp=+150°C, Package=SMCJ, Peak Pulse Current=28.2A, Peak Pulse Power=1500W, Reverse Standoff Voltage=33V, Temperature="-65°C to +150°C", Temperature Range Low=-65°C, Automotive=No, Category=Diode, ComponentLink2Description=Datasheet, ComponentLink2URL=https://upverter.com/datasheet/776ad76c8c447792c68262141a14e01aaf7c6fbe.pdf, Device Class L1="Circuit Protection", Device Class L2="TVS Diodes", Device Class L3=unset, Digikey Description="TVS DIODE 33V 53.3V DO214AB", Direction=Unidirectional, Height=2.62mm, Lead Free=Yes, Mouser Description="Diode Transient Voltage Suppressor (TVS) Single Uni Directional 33V 1.5KW 2-Pin SMC T/R", Number Of Channels=1, Octopart=https://octopart.com/smcj33a-littelfuse-351660, RoHS=TRUE, Temperature Range High=+150°C
D4: library part CMP-08607-000085-1, "SMAJ24A / TVS DIODE 24V 38.9V DO214AC", Breakdown Voltage=26.7V, Clamping Voltage=38.9V, Manufacturer="Littelfuse Inc", Manufacturer Part Number=SMAJ24A, Max Junction Temp=+150°C, Package=SMAJ, Peak Pulse Current=10.3A, Peak Pulse Power=400W, Reverse Standoff Voltage=24V, Temperature="-65°C to +150°C", Temperature Range Low=-65°C, Automotive=No, Category=Diode, ComponentLink2Description=Datasheet, ComponentLink2URL=https://www.littelfuse.com/~/media/electronics/datasheets/tvs_diodes/littelfuse_tvs_diode_smaj_datasheet.pdf.pdf, Device Class L1="Circuit Protection", Device Class L2="TVS Diodes", Device Class L3=unset, Digikey Description="TVS DIODE 24V 38.9V DO214AC", Direction=Unidirectional, Height=2.29mm, Lead Free=Yes, Mouser Description="In a Pack of 25, Littelfuse SMAJ24A, Uni-Directional TVS Diode, 400W, 2-Pin DO-214AC", Number Of Channels=1, Octopart=https://octopart.com/smaj24a-littelfuse-350003, RoHS=TRUE, Temperature Range High=+150°C
D5 D6: library part CMP-2000-06230-3, "DIODE GEN PURP 200V 1A SMA", Capacitance=7pF, Forward Current=1A, Manufacturer="ON Semi", Max Junction Temp=+150°C, Max Repetitive Reverse Voltage=200V, Max Surge Forward Current=30A, Package=403AE, Peak Reverse Current=5uA, Temperature="-50°C to +150°C", Temperature Range Low=-50°C, Automotive=No, Category=Diode, ComponentLink2Description=Datasheet, ComponentLink2URL=https://www.onsemi.jp/PowerSolutions/document/ES1D-D.PDF, Device Class L1="Discrete Semiconductors", Device Class L2=Diodes, Device Class L3="Rectifier Diodes", Digikey Description="DIODE GEN PURP 200V 1A SMA", Footprint Url=http://www.onsemi.com/pub/Collateral/403AE.PDF, Height=2.5mm, Lead Free=Yes, Manufacturer Part Number=ES1D, Octopart=https://octopart.com/es1d-on+semiconductor-84324855, RoHS=TRUE, Standoff Height=0.05mm, Temperature Range High=+150°C
F1 F2: library part CMP-2000-05464-2, "3568", Color=Black, Current Rating=20A, Flammability Rating="UL94 V-0", Max Operating Temperature=145°C, Min Operating Temperature=-50°C, Voltage=500V, Approvals=UL, Body Material=Nylon, Contact Material=Brass, Contact Plating=Tin, Depth=6.73mm, Fuse Current=20A, Illumination Type=Illuminated, Lead Free="Lead Free", Length=16mm, Material="Brass, Nylon, Tin", Mount="PCB, Vertical", NexarPartId=8116161, Number of Circuits=1, Number of Poles=1, Orientation=Vertical, REACH SVHC="No SVHC", RoHS=Compliant, Termination="PC Pin", Voltage Rating (AC)=500V
J1 J2 J3 J4 J7: library part CMP-2000-05797-1, "1714955 / PC Terminal Block, Pitch 6.35 mm, 1 x 2 Position, Height 21.5 mm, Tail Lenght 5.1 mm, RoHS, Bulk", Manufacturer="Phoenix Contact", Package Description="PC Terminal Block, Pitch 6.35 mm, 1 x 2 Position, Height 21.5 mm, Tail Lenght 5.1 mm", Package Reference=1714955, Datasheet URL=http://media.digikey.com/pdf/Data%20Sheets/Phoenix%20Contact%20PDFs/1714955.pdf, Datasheet Version=02/2010, Manufacturer URL=http://www.phoenixcontact.com/, Mounting Technology=ThroughHole
J5: library part CMP-139044-000001-1, "GROVE 2MM 4PIN VERT CONN 10PCS", Series=-
J6: "Headers for NUCLEO L476RG T6 Board.", Manufacturer="Amphenol FCI", Manufacturer Part Number=76342-319LF, Supplier Part Number 1=649-76342-319LF, ComponentLink1Description="Mouser Link", ComponentLink1URL=https://www.mouser.pl/ProductDetail/Amphenol-FCI/76342-319LF?qs=5xI8GKdkXlkDdCCMwMnBAg%3D%3D, Supplier 1=Mouser
L1: "Inductor", Manufacturer_Name=Bourns, Mouser Part Number=542-1140-101K-RC, Arrow Part Number=1140-101K-RC, Arrow Price/Stock=https://www.arrow.com/en/products/1140-101k-rc/bourns?region=europe, Datasheet Link=http://www.bourns.com/docs/Product-Datasheets/1140_series.pdf, Height=26.162mm, Manufacturer_Part_Number=1140-101K-RC, Mouser Price/Stock=https://www.mouser.co.uk/ProductDetail/Bourns/1140-101K-RC?qs=OvPYepjWVtSJktibIwUvvA%3D%3D
Q1 Q2 Q3 Q4 Q6 Q7: library part CMP-32901-001127-1, "IPB031N08N5ATMA1 / MOSFET N-CH 80V 120A D2PAK", Case/Package=TO-263-3, Continuous Drain Current (ID)=120A, Drain to Source Breakdown Voltage=80V, Drain to Source Resistance=4.1mR, Gate to Source Voltage (Vgs)=20V, Input Capacitance=6.24nF, Max Operating Temperature=175°C, Max Power Dissipation=167W, Min Operating Temperature=-55°C, Package Quantity=1000, Drain to Source Voltage (Vdss)=80V, Element Configuration=Single, Fall Time=12ns, Halogen Free="Halogen Free", Lead Free="Contains Lead", Max Dual Supply Voltage=80V, Mount="Surface Mount", Number Of Channels=1, Number of Pins=3, Packaging="Tape and Reel", Polarity=N-CHANNEL, Rds On Max=3.1mR, Rise Time=18ns, RoHS Compliant=Yes, Series=OptiMOS™, Turn-Off Delay Time=37ns, Turn-On Delay Time=18ns, Weight=0.139332oz
Q5: library part CMP-1048-00481-1, "General Purpose Transistor, NPN Silicon, 4-Pin SOT-223, Pb-Free, Tape and Reel", Manufacturer="On Semiconductor", ComponentLink1Description="Manufacturer URL", ComponentLink1URL=http://www.onsemi.com/, ComponentLink2Description=Datasheet, ComponentLink2URL=http://www.onsemi.com/pub_link/Collateral/PZT3904T1-D.PDF, ComponentLink3Description="Package Specification", ComponentLink3URL=http://www.onsemi.com/pub_link/Collateral/318E-04.PDF, DatasheetVersion="Rev. 6", fT Min (MHz)=300, IC Continuous (A)=0.2, Mounting Technology="Surface Mount", PackageDescription="4-Pin Small Outline Transistor, Body 6.5 x 3.5 mm, Pitch 2.3 mm", PackageReference=SOT-223-4-318E-04, PackageVersion="Rev. N, 08/2009", Packing="Tape and Reel", PartNumber=PZT3904T1G, Polarity=NPN, RoHS=TRUE
Q8: library part CMP-22018-000005-1, "OPTOISOLATOR 5KV 2CH TRANS 8-SMD", Case/Package=SMD/SMT, Collector Emitter Saturation Voltage=200mV, Collector Emitter Voltage (VCEO)=35V, Current Transfer Ratio=600%, Forward Current=50mA, Forward Voltage=1.4V, Isolation Voltage=5kV, Max Operating Temperature=110°C, Max Power Dissipation=200mW, Min Operating Temperature=-30°C, Package Quantity=1000, Reverse Breakdown Voltage=6V, Fall Time=18000ns, Lead Free="Lead Free", Max Collector Current=50mA, Max Input Current=50mA, Max Output Voltage=35V, Mount="Surface Mount", Number Of Channels=2, Number of Circuits=2, Number of Elements=2, Number of Pins=8, Output Current per Channel=50mA, Output Voltage=35V, Packaging="Tape and Reel", Power Dissipation=200mW, Radiation Hardening=No, Rise Time=18000ns
R1 R5: library part CMP-03412-017249-1, "RT1206FRE071K02L / RES SMD 1.02K OHM 1% 1/4W 1206", Manufacturer=Yageo, Manufacturer Part Number=RT1206FRE071K02L, Package=RT1206, Power Rating=0.25W, Resistance=1.02KΩ, Temperature="-55°C to +155°C", Temperature Coefficient="50 ppm/°C", Temperature Range High=+155°C, Temperature Range Low=-55°C, Tolerance=0.0002, Voltage Rating=200V, Automotive=No, Category=Res, ComponentLink2Description=Datasheet, ComponentLink2URL=http://www.yageo.com/documents/recent/PYu-RT_1-to-0.01_RoHS_L_9.pdf, Composition="Thin Film", Device Class L1="Passive Components", Device Class L2=Resistors, Device Class L3="Chip SMD Resistors", Digikey Description="RES SMD 1.02K OHM 1% 1/4W 1206", Footprint Url=http://www.yageo.com/exep/pages/download/literatures/PYu-R_Mount_10.pdf, Height=0.65mm, Ipc Land Pattern Name=RESC310160X55, Lead Free=Yes, Mouser Description="Thin Film Resistors - SMD 1/4W 1.02K ohm 1% 50ppm", Octopart=https://octopart.com/rt1206fre071k02l-yageo-1242575, RoHS=TRUE, Series=RT
R2: library part CMP-2003-04092-2, "RT1206FRE0747KL / RES SMD 47K OHM 1% 1/4W 1206", Manufacturer=Yageo, Manufacturer Part Number=RT1206FRE0747KL, Package=RT1206, Power Rating=0.25W, Resistance=47KΩ, Temperature="-55°C to +155°C", Temperature Coefficient="50 ppm/°C", Temperature Range High=+155°C, Temperature Range Low=-55°C, Tolerance=0.0002, Voltage Rating=200V, Automotive=No, Category=Res, ComponentLink2Description=Datasheet, ComponentLink2URL=http://www.yageo.com/documents/recent/PYu-RT_1-to-0.01_RoHS_L_9.pdf, Composition="Thin Film", Device Class L1="Passive Components", Device Class L2=Resistors, Device Class L3="Chip SMD Resistors", Digikey Description="RES SMD 47K OHM 1% 1/4W 1206", Footprint Url=http://www.yageo.com/exep/pages/download/literatures/PYu-R_Mount_10.pdf, Height=0.65mm, Ipc Land Pattern Name=RESC310160X55, Lead Free=Yes, Mouser Description="Thin Film Resistors - SMD 1/4W 47K ohm 1% 50ppm", Octopart=https://octopart.com/rt1206fre0747kl-yageo-1208366, RoHS=TRUE, Series=RT
R3 R6 R7 R16 R17: library part CMP-2003-04091-2, "RT1206FRE0710RL / RES SMD 10 OHM 1% 1/4W 1206", Manufacturer=Yageo, Manufacturer Part Number=RT1206FRE0710RL, Package=RT1206, Power Rating=0.25W, Resistance=10Ω, Temperature="-55°C to +155°C", Temperature Coefficient="50 ppm/°C", Temperature Range High=+155°C, Temperature Range Low=-55°C, Tolerance=0.0002, Voltage Rating=200V, Automotive=No, Category=Res, ComponentLink2Description=Datasheet, ComponentLink2URL=http://www.yageo.com/documents/recent/PYu-RT_1-to-0.01_RoHS_L_9.pdf, Composition="Thin Film", Device Class L1="Passive Components", Device Class L2=Resistors, Device Class L3="Chip SMD Resistors", Digikey Description="RES SMD 10 OHM 1% 1/4W 1206", Footprint Url=http://www.yageo.com/exep/pages/download/literatures/PYu-R_Mount_10.pdf, Height=0.65mm, Ipc Land Pattern Name=RESC310160X55, Lead Free=Yes, Mouser Description="High Precision-High Stability Chip Resistor Thin Film 1206 10Ohm 1% Paper T/R", Octopart=https://octopart.com/rt1206fre0710rl-yageo-1385105, RoHS=TRUE, Series=RT
R4 R8 R9 R10 R21 R22 R26: library part CMP-2003-04299-2, "RT1206FRE0710KL / RES 10.0K OHM 1/4W 1% SMD 1206", Manufacturer=Yageo, Manufacturer Part Number=RT1206FRE0710KL, Package=RT1206, Power Rating=0.25W, Resistance=10KΩ, Temperature="-55°C to +155°C", Temperature Coefficient="50 ppm/°C", Temperature Range High=+155°C, Temperature Range Low=-55°C, Tolerance=0.0002, Voltage Rating=200V, Automotive=No, Category=Res, ComponentLink2Description=Datasheet, ComponentLink2URL=http://www.yageo.com/documents/recent/PYu-RT_1-to-0.01_RoHS_L_9.pdf, Composition="Thin Film", Device Class L1="Passive Components", Device Class L2=Resistors, Device Class L3="Chip SMD Resistors", Digikey Description="RES 10.0K OHM 1/4W 1% SMD 1206", Footprint Url=http://www.yageo.com/exep/pages/download/literatures/PYu-R_Mount_10.pdf, Height=0.65mm, Ipc Land Pattern Name=RESC310160X55, Lead Free=Yes, Mouser Description="Thin Film Resistors 1/4W 10K ohm 1% 50ppm", Octopart=https://octopart.com/rt1206fre0710kl-yageo-1169575, RoHS=TRUE, Series=RT
R11 R12 R13 R14 R15: library part CMP-2003-04318-2, "RT1206FRE074K7L / RES SMD 4.7K OHM 1% 1/4W 1206", Manufacturer=Yageo, Manufacturer Part Number=RT1206FRE074K7L, Package=RT1206, Power Rating=0.25W, Resistance=4.7KΩ, Temperature="-55°C to +155°C", Temperature Coefficient="50 ppm/°C", Temperature Range High=+155°C, Temperature Range Low=-55°C, Tolerance=0.0002, Voltage Rating=200V, Automotive=No, Category=Res, ComponentLink2Description=Datasheet, ComponentLink2URL=http://www.yageo.com/documents/recent/PYu-RT_1-to-0.01_RoHS_L_9.pdf, Composition="Thin Film", Device Class L1="Passive Components", Device Class L2=Resistors, Device Class L3="Chip SMD Resistors", Digikey Description="RES SMD 4.7K OHM 1% 1/4W 1206", Footprint Url=http://www.yageo.com/exep/pages/download/literatures/PYu-R_Mount_10.pdf, Height=0.65mm, Ipc Land Pattern Name=RESC310160X55, Lead Free=Yes, Mouser Description="Res Thin Film 1206 4.7K Ohm 1% 0.25W(1/4W) ?50ppm/C Molded SMD Paper T/R", Octopart=https://octopart.com/rt1206fre074k7l-yageo-1218966, RoHS=TRUE, Series=RT
R18 R19 R20: library part CMP-2003-04272-2, "RT1206BRD07100KL / RES 100K OHM 1/4W .1% SMD 1206", Manufacturer=Yageo, Manufacturer Part Number=RT1206BRD07100KL, Package=RT1206, Power Rating=0.25W, Resistance=100KΩ, Temperature="-55°C to +155°C", Temperature Coefficient="25 ppm/°C", Temperature Range High=+155°C, Temperature Range Low=-55°C, Tolerance=0.005, Voltage Rating=200V, Automotive=No, Category=Res, ComponentLink2Description=Datasheet, ComponentLink2URL=http://www.yageo.com/documents/recent/PYu-RT_1-to-0.01_RoHS_L_9.pdf, Composition="Thin Film", Device Class L1="Passive Components", Device Class L2=Resistors, Device Class L3="Chip SMD Resistors", Digikey Description="RES 100K OHM 1/4W .1% SMD 1206", Footprint Url=http://www.yageo.com/exep/pages/download/literatures/PYu-R_Mount_10.pdf, Height=0.65mm, Ipc Land Pattern Name=RESC310160X55, Lead Free=Yes, Mouser Description="Res Thin Film 1206 100K Ohm 0.1% 0.25W(1/4W) ±25ppm/C Epoxy Pad SMD T/R", Octopart=https://octopart.com/rt1206brd07100kl-yageo-1375718, RoHS=TRUE, Series=RT
R23 R24: library part CMP-2003-04104-2, "RT1206FRE07680RL / RES SMD 680 OHM 1% 1/4W 1206", Manufacturer=Yageo, Manufacturer Part Number=RT1206FRE07680RL, Package=RT1206, Power Rating=0.25W, Resistance=680Ω, Temperature="-55°C to +155°C", Temperature Coefficient="50 ppm/°C", Temperature Range High=+155°C, Temperature Range Low=-55°C, Tolerance=0.0002, Voltage Rating=200V, Automotive=No, Category=Res, ComponentLink2Description=Datasheet, ComponentLink2URL=http://www.yageo.com/documents/recent/PYu-RT_1-to-0.01_RoHS_L_9.pdf, Composition="Thin Film", Device Class L1="Passive Components", Device Class L2=Resistors, Device Class L3="Chip SMD Resistors", Digikey Description="RES SMD 680 OHM 1% 1/4W 1206", Footprint Url=http://www.yageo.com/exep/pages/download/literatures/PYu-R_Mount_10.pdf, Height=0.65mm, Ipc Land Pattern Name=RESC310160X55, Lead Free=Yes, Mouser Description="Res Thin Film 1206 680 Ohm 1% 1/4W ±50ppm/°C Molded SMD SMD Paper T/R", Octopart=https://octopart.com/rt1206fre07680rl-yageo-1466321, RoHS=TRUE, Series=RT
R25: library part CMP-2003-04314-2, "RT1206FRE073K3L / RES SMD 3.3K OHM 1% 1/4W 1206", Manufacturer=Yageo, Manufacturer Part Number=RT1206FRE073K3L, Package=RT1206, Power Rating=0.25W, Resistance=3.3KΩ, Temperature="-55°C to +155°C", Temperature Coefficient="50 ppm/°C", Temperature Range High=+155°C, Temperature Range Low=-55°C, Tolerance=0.0002, Voltage Rating=200V, Automotive=No, Category=Res, ComponentLink2Description=Datasheet, ComponentLink2URL=http://www.yageo.com/documents/recent/PYu-RT_1-to-0.01_RoHS_L_9.pdf, Composition="Thin Film", Device Class L1="Passive Components", Device Class L2=Resistors, Device Class L3="Chip SMD Resistors", Digikey Description="RES SMD 3.3K OHM 1% 1/4W 1206", Footprint Url=http://www.yageo.com/exep/pages/download/literatures/PYu-R_Mount_10.pdf, Height=0.65mm, Ipc Land Pattern Name=RESC310160X55, Lead Free=Yes, Mouser Description="Thin Film Resistors - SMD 1/4W 3.3K ohm 1% 50ppm", Octopart=https://octopart.com/rt1206fre073k3l-yageo-1236583, RoHS=TRUE, Series=RT
U1: library part CMP-09131-000172-1, "LTC4359IS8#PBF / IDEAL DIODE CONTROLLER WITH REVE", RoHS Compliant=Yes
U2: library part CMP-1557-00014-2, "SENSOR CURRENT HALL 12.5A AC/DC", Case/Package=SOIC, Current Sensing=12.5A, Frequency=100kHz, Max Operating Temperature=85°C, Max Supply Current=5.5mA, Min Operating Temperature=-40°C, Operating Supply Voltage=3.3V, Package Quantity=1, -3db Bandwidth=100kHz, Accuracy=5%, Linearity=1%, Number Of Channels=1, Number of Pins=8, Packaging="Tape and Reel", Polarity=Bidirectional, Response Time=4.6us, RoHS Compliant=Yes, Sensitivity=110mV/A, Series=-
U3: library part CMP-01539-104759533-1, "TSR 1-4850WI DC-DC Converter, POL, Industrial, Encapsulated, 1A, 5V Out, 9-72V In", Output Power=5W, NexarPartId=104759533
U4: library part CMP-01539-104759529-1, "TSR 1-48120WI DC-DC Converter, POL, Industrial, Encapsulated, 1A, 12V Out, 17-72V In", Output Power=12W, NexarPartId=104759529
U5: library part CMP-00572-88252434-2, "Driver 2.5A 4-OUT Hi/Lo Side Full Brdg/Half Brdg Inv/Non-Inv Automotive 20-Pin PDIP Tube", Case/Package=PDIP, Manufacturer Lifecycle Status=ACTIVE, Max Operating Temperature=85°C, Max Output Current=2.5A, Max Output Voltage=15V, Max Power Dissipation=440mW, Max Supply Current=15.5mA, Min Operating Temperature=-40°C, Min Supply Voltage=9.5V, Nominal Supply Current=10.5mA, Output Voltage=12.6V, Switching Frequency=1MHz, ComponentLink1Description="Manufacturer's Website", ComponentLink1URL=http://www.renesas.com, ComponentLink2Description="Datasheet URL", ComponentLink2URL=https://octopart.com/cad-content/api/get-model-datasheet/15189/88252434, ComponentLink3Description="Manufacturer's Package Drawing", ComponentLink3URL=https://www.renesas.com/en/document/psc/e203-20-lead-dual-line-plastic-packages, Export Control Classification Number (ECCN) Code=EAR99, Fall Time=10ns, Height=3.94mm, HelpURL=https://octopart.com/cad-content/api/get-model-datasheet/15189/88252434, Lead Free="Lead Free", Length=26.2mm, Lifecycle Status=Production, Max Supply Voltage=15V, Mount="Through Hole", Number Of Channels=4, Number of Drivers=1, Number of Outputs=4, Number of Pins=20, Output Current=2.5A, Overload Protection="Under Voltage", Packaging=Bulk, Pitch=2.5mm, Propagation Delay=30ns, RAM Size=32kB, REACH SVHC=No, Rise Time=10ns, RoHS=Compliant, Turn-Off Delay Time=90ns, Turn-On Delay Time=110ns, Width=6.6mm

## Via types
v1: diameter 1.8, hole 0.9, Top Layer to Bottom Layer, 49 vias
v2: diameter 1.27, hole 0.711, Top Layer to Bottom Layer, 6 vias
v3: diameter 1.2, hole 0.6, Top Layer to Bottom Layer, 1 vias
v4: diameter 1.8, hole 1, Top Layer to Bottom Layer, 1 vias

## Nets (pads, with @x,y where several pads share a name; then routed paths per layer and width w, separated by ;. In a path a pad name is that pad's centre, name@x,y a point inside that pad or via, vN(x,y) a via of type N, cw(c..) or ccw(c..) an arc to the next point about the centre after c; other vN are vias at no path point)
3V3_STM32: C3.1 J6.16 R23.1 R25.1 R26.1 U2.8 | length 306.4
  Top Layer w0.6: R25.1 60.046,61.798 R26.1 25.908,57.658 25.908,-2.54 46.99,-2.54 J6.16 ; U2.8 128.524,84.455 C3.1
  Bottom Layer w0.6: v1(8.89,67.31) 13.97,62.23 21.844,62.23 v1(24.638,65.024) 49.012,65.024 49.45,64.586 125.386,64.586 129.24,68.44 129.24,82.525 129.565,82.85 129.985,82.85 130.337,83.201 130.337,83.276 130.81,83.749 v1(130.81,84.074)
5V_STM32: C22.2 J6.6 U3.3 | length 145.7
  Top Layer w0.6: v1(4.572,71.628) 4.572,71.303 3.464,70.195 3.464,1.616 v1@9.398,-4.318 ; v1(16.51,-3.556) v1(21.844,-3.556) ; U3.3 31.88,75.476 C22.2 32.004,73.876 v1(32.004,70.866)
  Bottom Layer w0.6: v1(4.572,71.628) 30.917,71.628 31.679,70.866 v1(32.004,70.866) ; v1(9.652,-4.572) 15.169,-4.572 16.185,-3.556 v1(16.51,-3.556) ; v1(21.844,-3.556) 31.75,-3.556 J6.6
12V_DRIVER: C19.1 C20.2 C24.2 D5.2 D6.2 R10.1 U4.3 U5.15 U5.16 | length 227.1
  Top Layer w0.6: C20.2 42.835,70.437 42.835,68.423 43.186,68.072 47.752,68.072 ; U4.3 48.39,75.476 C24.2 C19.1 48.64,68.96 47.752,68.072 ; v1(58.039,2.159) 54.572,5.626 54.572,27.648 R10.1 47.498,27.686 47.498,40.035 48.103,40.64 60.177,40.64 60.731,41.194 66.269,41.194 67.077,40.386 80.167,40.386 80.518,40.737 80.518,67.467 80.167,67.818 66.699,67.818 63.848,70.669 62.644,70.669 60.047,68.072 47.752,68.072 ; U5.15 80.636,20.066 ; U5.16 80.636,22.606 ; D6.2 80.636,22.606 ; v1(81.534,2.286) 81.534,5.013 80.959,5.588 D5.2 80.636,20.066 ; 80.636,20.066 80.636,22.606
  Bottom Layer w0.6: v1(58.039,2.159) 81.407,2.159 v1(81.534,2.286)
BAT_IN+: C1.1 J2.1 Q2.4 U1.8
BAT_OUT+: F2.1 J3.1
BAT_OUT-: C3.2 C4.1 C5.1 C6.1 C7.1 C8.1 C9.1 C10.1 C11.1 C12.2 C13.2 C14.1 C15.1 C19.2 C20.1 C21.1 C22.1 C23.1 C24.1 J3.2 J6.8 J6.19 J6.20 J6.22 J6.47 J6.58 J7.2 Q5.3 Q6.3 Q7.3 Q8.5 R12.1 R13.1 R14.1 R15.1 R18.2 R19.2 R20.2 R21.2 R22.2 U2.5 U3.2 U4.2 U5.4 U5.14 U5.17 | length 323.5
  Top Layer w0.6: C21.1 v1@25.4,74.676 ; v1(25.4,73.914) 25.4,67.564 26.873,66.091 62.795,66.091 63.246,66.542 J7.2 ; U3.2 v1@25.4,74.676 ; C22.1 v1@25.4,74.676 ; C23.1 v1@41.91,74.676 ; C20.1 41.16,72.839 41.91,73.589 v1(41.91,73.914) ; U4.2 v1@41.91,74.676 ; C19.2 C24.1 v1@41.91,74.676 ; J6.22 54.82,-5.886 55.375,-5.886 56.568,-4.692 61.648,-4.692 62.004,-4.336 62.004,12.192 ; Q5.3 Q5.3@62.004,25.146 ; R20.2 62.004,12.192 ; R12.1 62.004,17.526 ; R13.1 62.004,20.066 ; R15.1 62.004,22.606 ; R19.2 62.004,15.24 ; U5.14 73.914,17.526 73.914,25.146 ; U5.17 73.914,25.146 ; U2.5 128.524,80.645 C3.2 ; 62.004,12.192 62.004,15.24 ; 62.004,15.24 62.004,17.526 ; 62.004,17.526 62.004,20.066 ; 62.004,20.066 62.004,22.606 ; 62.004,22.606 Q5.3@62.004,25.146 ; Q5.3@62.004,25.146 67.037,25.146 67.075,25.108 69.533,25.108 69.571,25.146 U5.4 73.914,25.146
  Bottom Layer w0.6: J3.2 2.794,76.2 2.794,48.768 21.336,48.768 ; v1(21.336,53.34) 21.336,48.768 ; J6.47 39.37,48.768 27.178,48.768 ; J6.58 52.07,56.896 27.178,56.896 27.178,48.768 ; v1(53.848,34.29) 58.577,34.29 58.928,33.939 58.928,25.497 59.279,25.146 U5.4 ; U5.17 v1(82.296,25.146) ; 21.336,48.768 27.178,48.768
  other v1: 82.296,30.734 96.266,30.734 122.428,30.988 82.296,33.02 96.266,33.02 122.428,33.02 115.824,69.85 119.126,69.85 122.428,69.85 130.81,81.28
BRIDGE_EN: J6.63 R11.1 R18.1 | length 37.2
  Top Layer w0.6: v1(51.816,38.862) 49.708,38.862 R18.1 49.708,29.972 R11.1 ; v1(58.166,44.45) 59.69,44.45 J6.63
  Bottom Layer w0.6: v1(51.816,38.862) 58.166,38.862 v1(58.166,44.45)
BUT_CTRL: J6.3 J7.1 R26.2 | length 159.4
  Top Layer w0.6: v1(29.21,42.926) 53.824,42.926 54.008,42.742 55.212,42.742 55.396,42.926 75.983,42.926 76.334,43.277 76.334,55.446 74.122,57.658 R26.2 J7.1
  Bottom Layer w0.6: v1(29.21,42.926) 19.401,42.926 19.05,42.575 19.05,-11.587 19.401,-11.938 31.75,-11.938 J6.3
CHG_CTRL: D1.2 J6.67 | length 97.6
  Top Layer w0.6: v1(72.898,66.04) 78.389,66.04 78.74,65.689 78.74,58.195 78.232,57.687 v1(78.232,49.276) ; v1(72.898,70.358) v1(72.898,80.609)
  Bottom Layer w0.6: J6.67 64.77,49.276 v1(78.232,49.276) ; v1(72.898,66.04) v1(72.898,70.358) ; v1(72.898,80.609) 72.898,124.551
  other v2: 42.672,116.078
FAULT_ACS: Q5.1 R11.2 U2.6 | length 118.1
  Top Layer w0.6: R11.2 ccw(c57.844,29.972) 57.844,29.862 Q5.1 62.23,29.862 v1(62.23,34.036) ; 64.516,39.187 81.437,39.187 81.788,39.539 81.788,66.872 v1(81.972,67.056) ; U2.6 125.984,81.915 v3(125.984,82.55)
  Bottom Layer w0.6: 80.957,66.391 125.983,66.391 126.335,66.742 126.335,82.037 125.984,82.388 v3(125.984,82.55)
  other v1: 62.23,39.37
JBD_GND: J5.1 Q8.4 Q8.7 | length 21.4
  Top Layer w0.6: Q8.4 12.518,55.98 13.97,57.432 13.97,60.96 ; J5.1 13.97,60.96 ; Q8.7 13.97,60.96
JBD_RXD: J5.2 Q8.8 | length 11.1
  Top Layer w0.6: J5.2 15.97,63.5 Q8.8
JBD_TXD: J5.3 R24.1 | length 26.1
  Top Layer w0.6: R24.1 4.318,60.122 4.318,69.147 4.669,69.499 10.051,69.499 10.844,70.292 16.766,70.292 J5.3
NetC1_2: C1.2 D4.1 R2.2 R5.1 U1.6
  other v1: 40.64,119.38
  other v2: 39.116,118.618 39.116,120.142
NetC2_1: C2.1 R4.2
NetC4_2: C4.2 C5.2 C6.2 C7.2 C8.2 C9.2 C10.2 C11.2 C21.2 C23.2 F2.2 U2.1 U2.2 U3.1 U4.1 | length 50
  Top Layer w0.6: C21.2 18.92,75.476 U3.1 21.724,82.804 21.724,89.232 39.37,89.232 U4.1 35.43,75.476 C23.2
NetC12_1: C12.1 C13.1 C14.2 C15.2 Q3.4 Q4.4 U2.3 U2.4
NetC16_1: C16.1 D5.1 U5.10 | length 8.8
  Top Layer w0.6: U5.10 71.628,6.604 C16.1 72.64,6.229 72.691,5.854 ccw(c73.24,5.929) 73.24,5.375 74.34,5.375 ccw(c74.34,5.929) 74.4,5.378 75.311,5.477 D5.1
NetC17_1: C17.1 J4.2 L1.2
NetC18_1: C18.1 D6.1 U5.1 | length 8.9
  Top Layer w0.6: U5.1 71.628,36.068 C18.1 72.702,36.443 72.748,36.972 73.073,37.297 74.402,37.297 75.311,37.297 D6.1
NetD1_1: D1.1 R1.1
NetD2_1: D2.1 Q2.1 R3.1 R4.1 U1.1
  other v2: 50.038,107.442 43.18,120.142
NetD2_2: D2.2 Q1.3 Q2.3 U1.2
  other v1: 37.338,112.014 39.37,112.014 25.908,120.396
  other v4: 26.67,122.174
NetD3_1: D3.1 F1.2 Q1.4 U1.4
NetD3_2: D3.2 D4.2
NetQ1_1: Q1.1 R3.2
NetQ3_1: Q3.1 R6.1 R8.1
NetQ4_1: Q4.1 R7.1 R9.1
NetQ5_2: Q5.2 Q5.4 R10.2 U5.3 | length 14
  Top Layer w0.6: R10.2@57.734,27.432 cw(c57.864,27.432) 57.864,27.562 Q5.2 Q5.4 cw(c68.428,27.562) 68.428,27.686 U5.3
NetQ6_1: Q6.1 R16.1 R21.1
NetQ7_1: Q7.1 R17.1 R22.1
NetQ8_1: Q8.1 R23.2 | length 3.3
  Top Layer w0.6: R23.2 Q8.1
NetQ8_3: Q8.3 R24.2 | length 3.3
  Top Layer w0.6: R24.2 Q8.3
NetR1_2: R1.2 R2.1 U1.5
NetR19_1: R19.1 U5.8 | length 2.9
  Top Layer w0.6: R19.1 68.986,14.986 U5.8
NetR20_1: R20.1 U5.9 | length 3
  Top Layer w0.6: R20.1 68.91,12.446 U5.9
PWM_A_HIGH: J6.61 R12.2 U5.7 | length 79.2
  Top Layer w0.6: v1(43.434,48.514) v1(48.006,48.514) ; R12.2 U5.7
  Bottom Layer w0.6: v1(43.434,48.514) 43.434,17.526 U5.7 ; v1(48.006,48.514) 53.638,48.514 53.73,48.606 56.799,48.606 57.15,48.957 J6.61
PWM_A_LOW: J6.53 R13.2 U5.6 | length 60
  Top Layer w0.6: R13.2 U5.6
  Bottom Layer w0.6: J6.53 46.852,52.186 46.852,49.954 46.274,49.376 46.274,21.133 47.341,20.066 U5.6
PWM_B_HIGH: J6.59 R14.2 U5.2 | length 47.4
  Top Layer w0.6: v1(54.61,44.196) J6.59 ; R14.2 59.855,34.379 ; v1(59.436,36.068) 59.855,36.068 59.855,34.379 ; U5.2 67.915,30.226 67.564,30.577 67.564,35.463 67.213,35.814 61.29,35.814 59.855,34.379
  Bottom Layer w0.6: v1(54.61,44.196) 54.799,44.196 56.577,45.974 60.055,45.974 60.406,45.623 60.406,37.038 v1(59.436,36.068)
PWM_B_LOW: J6.66 R15.2 U5.5 | length 104.8
  Top Layer w0.6: R15.2 U5.5
  Bottom Layer w0.6: J6.66 62.44,55.074 62.995,55.074 64.188,56.268 75.512,56.268 79.756,52.024 79.756,48.103 79.405,47.752 54.083,47.752 47.128,40.797 47.128,22.86 71.628,22.86 U5.5
Q_AHO: R6.2 U5.11 | length 44.5
  Bottom Layer w0.6: U5.11 79.076,10.078 79.076,10.774 77.944,11.906 77.944,25.748 77.678,26.014 77.678,33.04 78.486,33.848 78.486,44.958 82.55,49.022 84.257,49.022 84.765,49.53 v1(85.09,49.53)
Q_ALO: R16.2 U5.13 | length 5.6
  Bottom Layer w0.6: U5.13 v1(84.836,14.986)
Q_BHO: R7.2 U5.20 | length 54.3